# Altium PCB PMP41115.PcbDoc (part 6 of 6)
Units mm, origin at the board's own origin, x right, y up, seen from the top; angles counter-clockwise.
Board outline 102.92 x 46.74 mm, 4 copper layers (Top Layer, Signal Layer 1, Signal Layer 2, Bottom Layer), stack 1.016 mm thick; 174 components, 114 nets, 547 pads, 2622 vias.
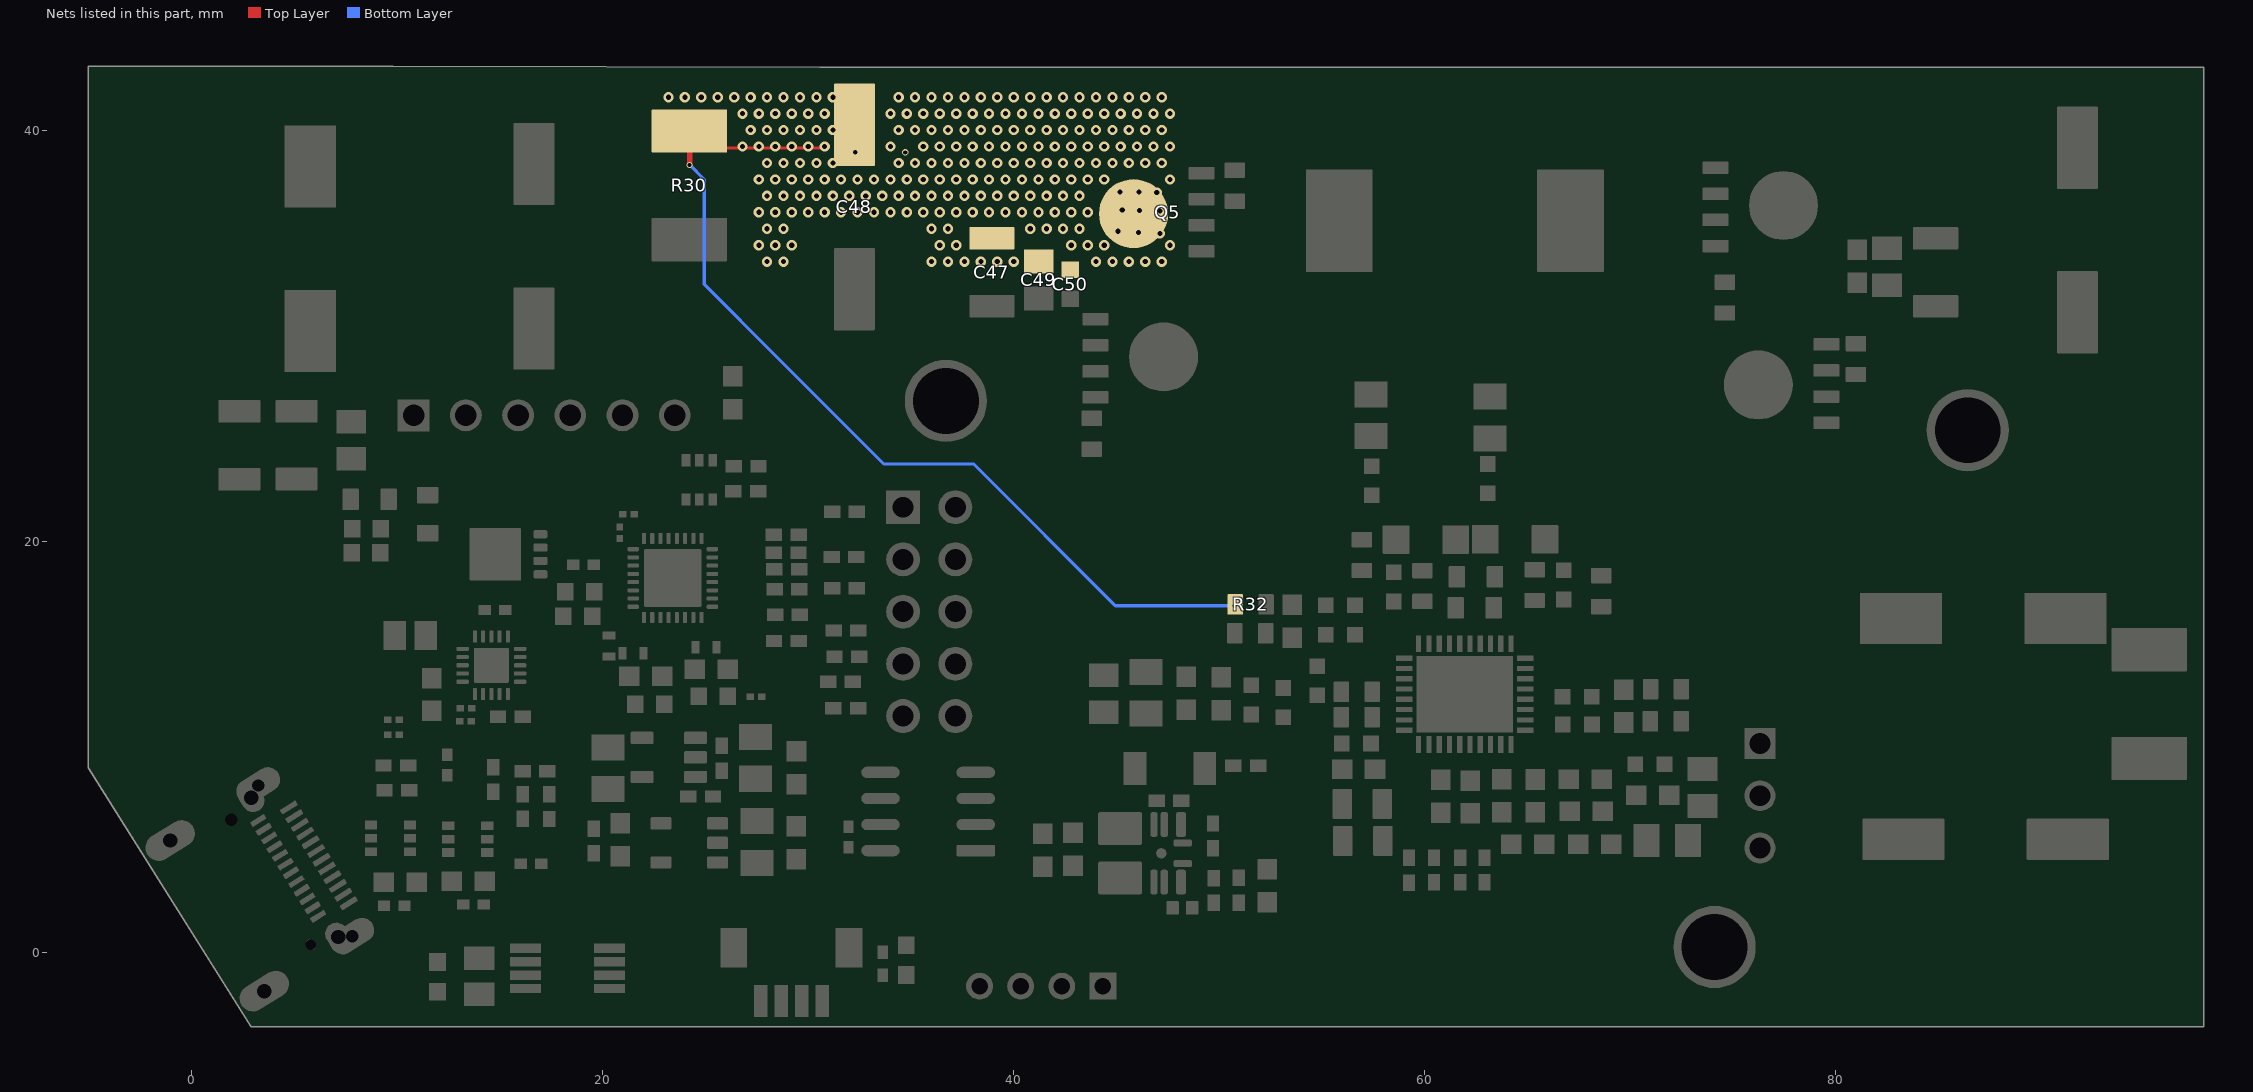
[diagram p6: the nets of this part, all layers, seen from the top]

## Via types
v1: diameter 0.5, hole 0.25, Top Layer to Bottom Layer, 2320 vias
v2: diameter 0.3, hole 0.2, Top Layer to Bottom Layer, tented both sides, 198 vias
v3: diameter 0.5, hole 0.25, Top Layer to Bottom Layer, tented both sides, 61 vias
v4: diameter 0.5, hole 0.2, Top Layer to Bottom Layer, tented both sides, 19 vias
v5: diameter 0.61, hole 0.203, Top Layer to Bottom Layer, tented both sides, 13 vias
v6: diameter 0.5, hole 0.2, Top Layer to Bottom Layer, 6 vias
v7: diameter 0.4, hole 0.2, Top Layer to Bottom Layer, tented both sides, 3 vias
v8: diameter 0.35, hole 0.2, Top Layer to Bottom Layer, tented both sides, 2 vias

## Nets (pads, with @x,y where several pads share a name; then routed paths per layer and width w, separated by ;. In a path a pad name is that pad's centre, name@x,y a point inside that pad or via, vN(x,y) a via of type N, cw(c..) or ccw(c..) an arc to the next point about the centre after c; other vN are vias at no path point) (continued)
VSYS: C47.2 C48.2 C49.1 C50.1 Q5.5-6-7-8 R30.2 R32.2 | length 47
  Top Layer w0.152: R30.2@24.243,39.979 R30.2@24.332,39.89 ; R30.2@24.257,39.091 24.257,39.815 R30.2@24.332,39.89 ; v1@30.863,39.181 30.823,39.141 25.081,39.141 R30.2@24.332,39.89
  Top Layer w0.254: v2(24.257,38.329) 24.257,39.051 24.297,39.091 R30.2@24.308,39.091
  Bottom Layer w0.152: 28.55,28.931 33.706,23.774 38.075,23.774 44.966,16.883 v2(50.764,16.883)
  Bottom Layer w0.154: v2(24.257,38.329) 24.968,37.617 24.968,32.512 28.55,28.931
  other v1: 28.023,33.621 28.823,33.621 36.023,33.621 36.823,33.621 37.623,33.621 38.423,33.621 39.223,33.621 40.023,33.621 44.023,33.621 44.823,33.621 45.623,33.621 46.423,33.621 47.223,33.621 27.623,34.421 28.423,34.421 29.223,34.421 36.423,34.421 37.223,34.421 42.823,34.421 43.623,34.421 44.423,34.421 47.623,34.421 28.023,35.221 28.823,35.221 36.023,35.221 36.823,35.221 40.823,35.221 41.623,35.221 42.423,35.221 43.223,35.221 27.623,36.021 28.423,36.021 29.223,36.021 30.023,36.021 30.823,36.021 31.623,36.021 32.423,36.021 33.223,36.021 34.023,36.021 34.823,36.021 35.623,36.021 36.423,36.021 37.223,36.021 38.023,36.021 38.823,36.021 39.623,36.021 40.423,36.021 41.223,36.021 42.023,36.021 42.823,36.021 43.623,36.021 28.023,36.821 28.823,36.821 29.623,36.821 30.423,36.821 31.223,36.821 32.023,36.821 32.823,36.821 33.623,36.821 34.423,36.821 35.223,36.821 36.023,36.821 36.823,36.821 37.623,36.821 38.423,36.821 39.223,36.821 40.023,36.821 40.823,36.821 41.623,36.821 42.423,36.821 43.223,36.821 27.623,37.621 28.423,37.621 29.223,37.621 30.023,37.621 30.823,37.621 31.623,37.621 32.423,37.621 33.223,37.621 34.023,37.621 34.823,37.621 35.623,37.621 36.423,37.621 37.223,37.621 38.023,37.621 38.823,37.621 39.623,37.621 40.423,37.621 41.223,37.621 42.023,37.621 42.823,37.621 43.623,37.621 44.423,37.621 47.623,37.621 28.023,38.421 28.823,38.421 29.623,38.421 30.423,38.421 31.223,38.421 34.423,38.421 35.223,38.421 36.023,38.421 36.823,38.421 37.623,38.421 38.423,38.421 39.223,38.421 40.023,38.421 40.823,38.421 41.623,38.421 42.423,38.421 43.223,38.421 44.023,38.421 44.823,38.421 45.623,38.421 46.423,38.421 47.223,38.421 26.823,39.221 27.623,39.221 28.423,39.221 29.223,39.221 30.023,39.221 30.823,39.221 34.023,39.221 35.623,39.221 36.423,39.221 37.223,39.221 38.023,39.221 38.823,39.221 39.623,39.221 40.423,39.221 41.223,39.221 42.023,39.221 42.823,39.221 43.623,39.221 44.423,39.221 45.223,39.221 46.023,39.221 46.823,39.221 47.623,39.221 27.223,40.021 28.023,40.021 28.823,40.021 29.623,40.021 30.423,40.021 31.223,40.021 34.423,40.021 35.223,40.021 36.023,40.021 36.823,40.021 37.623,40.021 38.423,40.021 39.223,40.021 40.023,40.021 40.823,40.021 41.623,40.021 42.423,40.021 43.223,40.021 44.023,40.021 44.823,40.021 45.623,40.021 46.423,40.021 47.223,40.021 26.823,40.821 27.623,40.821 28.423,40.821 29.223,40.821 30.023,40.821 30.823,40.821 34.023,40.821 34.823,40.821 35.623,40.821 36.423,40.821 37.223,40.821 38.023,40.821 38.823,40.821 39.623,40.821 40.423,40.821 41.223,40.821 42.023,40.821 42.823,40.821 43.623,40.821 44.423,40.821 45.223,40.821 46.023,40.821 46.823,40.821 47.623,40.821 23.223,41.621 24.023,41.621 24.823,41.621 25.623,41.621 26.423,41.621 27.223,41.621 28.023,41.621 28.823,41.621 29.623,41.621 30.423,41.621 31.223,41.621 34.423,41.621 35.223,41.621 36.023,41.621 36.823,41.621 37.623,41.621 38.423,41.621 39.223,41.621 40.023,41.621 40.823,41.621 41.623,41.621 42.423,41.621 43.223,41.621 44.023,41.621 44.823,41.621 45.623,41.621 46.423,41.621 47.223,41.621
  other v2: 34.747,38.938
  other v3: 47.13,34.995 46.088,35.046 45.098,35.096 47.13,36.087 46.139,36.112 45.301,36.138 46.977,36.976 45.199,37.001 46.114,37.001
  other v5: 32.309,38.938
pads on no net: J1.A2 J1.A3 J1.A10 J1.A11 J1.ALIGN1 J1.ALIGN2 J1.B2 J1.B3 J1.B10 J1.B11 J3.4 J5.5 J5.6 J6.4 Q1.9A Q1.9B Q1.9C Q1.9D U1.21 U2.9 U4.4 U5.1 U5.7 U6.4 U7.15 U7.16 U7.31 U8.2 U8.3

## Polygon pours and split planes (outlines as drawn)
GND on Top Layer "TOP_LAYER_GND_P036" (solid, remove dead copper, pour order 36): -5.004,-3.15 8.331,-3.15 8.331,43.078 -5.004,43.078
GND on Top Layer "TOP_LAYER_GND_P095" (solid, remove dead copper, pour order 95): 10.922,11.633 8.23,11.633 8.23,-3.327 17.958,-3.327 17.958,15.646 10.947,15.646 10.922,15.621
VBUS_C on Top Layer "TOP_LAYER_VBUS_C_P038" (solid, remove dead copper, pour order 38): 8.534,22.606 8.534,15.69 6.579,15.705 6.577,13.588 6.579,11.76 10.617,11.76 10.617,22.606
BAT on Top Layer "TOP_LAYER_BAT_P030" (solid, remove dead copper, pour order 30): 88.392,10.338 88.392,-2.87 97.434,-2.87 97.434,10.338
GND on Top Layer "TOP_LAYER_GND_P028" (solid, remove dead copper, pour order 28): 78.003,-3.023 87.478,-3.023 87.478,22.149 78.003,22.149
GND on Top Layer "TOP_LAYER_GND_P075" (solid, remove dead copper, pour order 75): 39.821,-3.175 79.099,-3.175 79.099,6.564 77.552,6.598 77.521,18.948 39.821,18.948
GND on Top Layer "TOP_LAYER_GND_P044" (solid, remove dead copper, pour order 44): 17.882,-3.378 41.681,-3.378 41.681,5.436 39.319,5.436 39.319,18.796 17.882,18.796
VSYS on Top Layer "TOP_LAYER_VSYS_P022" (solid, remove dead copper, pour order 22): 22.198,42.596 22.201,38.684 27.092,38.684 27.044,32.722 29.769,32.722 29.769,35.238 35.364,35.238 35.35,32.723 47.955,32.766 47.955,42.596
NetU5_5 on Top Layer "TOP_LAYER_NETU5_5_P001" (solid, pour order 1): 46.025,2.896 46.05,2.87 47.015,2.87 47.015,3.962 46.965,4.013 46.025,4.013
NetC21_1 on Top Layer "TOP_LAYER_NETC21_1_P115" (solid, remove dead copper, pour order 115): 46.482,7.696 46.482,5.791 46.66,5.613 47.422,5.613 47.523,5.715 47.523,6.807 47.371,6.96 47.371,7.696 46.507,7.696
PPHV on Top Layer "TOP_LAYER_PPHV_P033" (solid, remove dead copper, pour order 33): 0.483,33.223 0.483,24.841 12.065,24.841 12.065,27.127 3.937,27.127 3.937,33.223
VBUS on Top Layer "TOP_LAYER_VBUS_P034" (solid, remove dead copper, pour order 34): 22.174,25.73 18.771,22.327 13.335,22.327 13.335,21.234 10.82,21.234 10.82,16.205 10.82,14.63 13.894,14.63 13.894,17.729 16.408,17.729 16.408,20.142 16.408,20.752 27.457,20.752 27.457,27.127 22.174,27.127
PP5V on Top Layer "TOP_LAYER_PP5V_P114" (solid, remove dead copper, pour order 114): 20.396,18.136 20.828,18.567 21.768,18.567 21.844,18.491 21.844,17.983 21.768,17.907 20.904,17.907 20.371,17.374 20.371,15.85 19.101,15.85 19.101,17.983 19.253,18.136
VBUS_LV on Top Layer "TOP_LAYER_VBUS_LV_P054" (solid, remove dead copper, pour order 54): 16.586,17.653 13.919,17.653 13.919,15.646 14.808,15.646 14.808,17.043 17.625,17.043 17.805,17.223 17.805,19.228 18.999,19.228 18.999,18.491 21.692,18.491 21.895,18.694 21.895,19.228 21.742,19.38 21.133,19.38 20.396,20.117 16.586,20.117
GND on Top Layer "TOP_LAYER_GND_P039" (solid, remove dead copper, pour order 39): 12.497,27.813 12.497,24.536 0.686,24.536 0.686,21.641 13.03,21.641 13.03,22.657 19.101,22.657 21.92,25.476 21.92,27.813
GND on Top Layer "TOP_LAYER_GND_P032" (solid, remove dead copper, pour order 32): 4.115,27.381 28.118,27.408 28.118,21.107 30.378,21.107 30.378,32.41 4.115,32.41
PPHV on Top Layer "TOP_LAYER_PPHV_P031" (solid, remove dead copper, pour order 31): 0.559,42.647 21.514,42.647 21.514,35.763 26.467,35.763 26.467,32.766 20.498,32.766 0.559,32.766
P_OUT on Top Layer "TOP_LAYER_P_OUT_P029" (solid, remove dead copper, pour order 29): 93.143,33.604 93.089,18.596 88.179,18.596 88.179,13.882 97.739,13.882 97.739,33.604
P_OUT on Top Layer "TOP_LAYER_P_OUT_P027" (solid, remove dead copper, pour order 27): 75.311,42.647 75.311,33.426 97.917,33.426 97.917,42.647
GND on Top Layer "TOP_LAYER_GND_P026" (solid, remove dead copper, pour order 26): 78.537,19.177 85.7,19.177 93.269,19.177 93.269,33.249 78.537,33.249
SW2 on Top Layer "TOP_LAYER_SW2_P025" (solid, remove dead copper, pour order 25): 60.858,23.52 78.207,23.52 78.207,32.461 74.969,32.461 75.006,42.672 60.858,42.672
SW1 on Top Layer "TOP_LAYER_SW1_P024" (solid, remove dead copper, pour order 24): 48.235,42.596 48.235,32.741 48.006,32.512 45.187,32.512 45.187,23.647 59.893,23.647 59.893,42.596
GND on Top Layer "TOP_LAYER_GND_P023" (solid, remove dead copper, pour order 23): 29.186,34.773 29.186,19.101 83.439,19.101 83.439,23.216 45.009,23.216 45.009,34.773
GND on Bottom Layer "BOTTOM_LAYER_GND_P045" (solid, remove dead copper, pour order 45): 0.559,32.309 0.559,0.533 38.989,0.533 38.989,32.309
BAT on Bottom Layer "BOTTOM_LAYER_BAT_P146" (solid, remove dead copper, pour order 146): 88.392,10.338 88.392,-2.946 97.434,-2.946 97.434,10.338
GND on Bottom Layer "BOTTOM_LAYER_GND_P144" (solid, remove dead copper, pour order 144): 78.003,-2.921 87.478,-2.921 87.478,22.149 78.003,22.149
GND on Bottom Layer "BOTTOM_LAYER_GND_P046" (solid, remove dead copper, pour order 46): 35.179,0 77.902,0 77.902,10.312 35.179,10.312
GND on Bottom Layer "BOTTOM_LAYER_GND_P050" (solid, remove dead copper, pour order 50): 39.745,10.361 52.934,10.365 52.934,2.972 77.902,2.972 77.902,19.025 39.745,19.025
P_OUT on Bottom Layer "BOTTOM_LAYER_P_OUT_P145" (solid, remove dead copper, pour order 145): 93.143,33.604 93.089,18.596 88.179,18.596 88.179,13.882 97.739,13.882 97.739,33.604
P_OUT on Bottom Layer "BOTTOM_LAYER_P_OUT_P143" (solid, remove dead copper, pour order 143): 75.311,42.647 75.311,33.426 97.917,33.426 97.917,42.647
GND on Bottom Layer "BOTTOM_LAYER_GND_P142" (solid, remove dead copper, pour order 142): 78.537,19.177 85.7,19.177 93.269,19.177 93.269,33.249 78.537,33.249
SW2 on Bottom Layer "BOTTOM_LAYER_SW2_P141" (solid, remove dead copper, pour order 141): 60.858,23.52 78.207,23.52 78.207,32.461 74.969,32.461 75.006,42.672 60.858,42.672
VBUS on Bottom Layer "BOTTOM_LAYER_VBUS_P005" (solid, remove dead copper, pour order 5): 22.276,25.654 18.872,22.25 13.437,22.25 13.437,21.158 10.922,21.158 10.922,16.129 10.922,14.554 13.995,14.554 13.995,17.653 16.51,17.653 16.51,20.066 16.51,20.676 27.559,20.676 27.559,27.051 22.276,27.051
PPHV on Bottom Layer "BOTTOM_LAYER_PPHV_P007" (solid, remove dead copper, pour order 7): 0.662,32.944 0.662,24.867 12.065,24.867 12.065,27.153 3.937,27.153 3.937,32.944
VSYS on Bottom Layer "BOTTOM_LAYER_VSYS_P004" (solid, remove dead copper, pour order 4): 22.198,42.57 22.201,38.659 27.126,38.659 27.078,32.696 29.769,32.696 29.769,35.212 35.364,35.212 35.35,32.698 47.955,32.741 47.955,42.57
GND on Bottom Layer "BOTTOM_LAYER_GND_P120" (solid, remove dead copper, pour order 120): 35.159,32.398 35.159,35.031 29.931,35.031 29.931,32.371 27.813,32.36 27.813,19.329 80.899,19.329 80.899,23.089 44.602,23.089 44.602,32.36
PPHV on Bottom Layer "BOTTOM_LAYER_PPHV_P051" (solid, remove dead copper, pour order 51): 0.555,42.567 21.51,42.567 21.51,34.922 23.19,34.922 23.19,32.686 20.494,32.686 0.555,32.686
SW1 on Bottom Layer "BOTTOM_LAYER_SW1_P047" (solid, remove dead copper, pour order 47): 48.158,42.596 48.158,32.69 47.93,32.461 45.11,32.461 45.11,23.597 59.766,23.597 59.766,42.596
GND on Signal Layer 1 "SIGNAL_LAYER_1_GND_P069" (solid, remove dead copper, pour order 69): 0.66,4.623 0.66,-2.794 8.407,-2.794 8.407,4.623 8.407,24.308 0.66,24.308
VBUS_C on Signal Layer 1 "SIGNAL_LAYER_1_VBUS_C_P056" (solid, remove dead copper, pour order 56): 8.585,21.565 8.585,15.69 6.629,15.705 6.628,13.588 6.63,11.76 10.668,11.76 10.668,21.565
GND on Signal Layer 1 "SIGNAL_LAYER_1_GND_P073" (solid, remove dead copper, pour order 73): 10.973,11.633 8.28,11.633 8.28,-2.946 18.009,-2.946 18.009,15.646 10.998,15.646 10.973,15.621
BAT on Signal Layer 1 "SIGNAL_LAYER_1_BAT_P134" (solid, remove dead copper, pour order 134): 88.392,10.338 88.392,-2.946 97.434,-2.946 97.434,10.338
GND on Signal Layer 1 "SIGNAL_LAYER_1_GND_P132" (solid, remove dead copper, pour order 132): 78.003,-2.946 87.478,-2.946 87.478,22.149 78.003,22.149
GND on Signal Layer 1 "SIGNAL_LAYER_1_GND_P071" (solid, remove dead copper, pour order 71): 16.205,-2.972 78.029,-2.972 78.029,5.436 41.732,5.436 39.37,5.436 39.37,19.888 16.205,19.888
P_OUT on Signal Layer 1 "SIGNAL_LAYER_1_P_OUT_P133" (solid, remove dead copper, pour order 133): 93.143,33.604 93.089,18.596 88.179,18.596 88.179,13.882 97.739,13.882 97.739,33.604
P_OUT on Signal Layer 1 "SIGNAL_LAYER_1_P_OUT_P131" (solid, remove dead copper, pour order 131): 75.311,42.647 75.311,33.426 97.917,33.426 97.917,42.647
GND on Signal Layer 1 "SIGNAL_LAYER_1_GND_P130" (solid, remove dead copper, pour order 130): 78.537,19.177 85.7,19.177 92.837,19.177 92.837,33.249 78.537,33.249
SW2 on Signal Layer 1 "SIGNAL_LAYER_1_SW2_P129" (solid, remove dead copper, pour order 129): 60.858,23.52 78.207,23.52 78.207,32.487 74.969,32.487 75.006,42.672 60.858,42.672
GND on Signal Layer 1 "SIGNAL_LAYER_1_GND_P057" (solid, remove dead copper, pour order 57): 28.702,35.433 28.702,19.253 81.356,19.253 81.356,23.216 45.06,23.216 45.06,35.433
VSYS on Signal Layer 1 "SIGNAL_LAYER_1_VSYS_P118" (solid, remove dead copper, pour order 118): 22.198,42.57 22.201,38.659 27.092,38.659 27.044,32.696 29.769,32.696 29.769,35.212 35.364,35.212 35.35,32.698 47.955,32.741 47.955,42.57
VBUS on Signal Layer 1 "SIGNAL_LAYER_1_VBUS_P112" (solid, remove dead copper, pour order 112): 22.123,25.679 18.72,22.276 13.284,22.276 13.284,21.184 10.77,21.184 10.77,16.154 10.77,15.875 13.843,15.875 13.843,17.678 16.358,17.678 16.358,20.091 16.358,20.701 26.924,20.701 26.924,27.076 22.123,27.076
PPHV on Signal Layer 1 "SIGNAL_LAYER_1_PPHV_P111" (solid, remove dead copper, pour order 111): 0.611,32.868 0.611,24.79 12.014,24.79 12.014,27.076 3.886,27.076 3.886,32.868
GND on Signal Layer 1 "SIGNAL_LAYER_1_GND_P072" (solid, remove dead copper, pour order 72): 39.623,4.623 78.054,4.623 78.054,18.948 39.623,18.948
GND on Signal Layer 1 "SIGNAL_LAYER_1_GND_P070" (solid, remove dead copper, pour order 70): 12.548,27.813 12.548,24.536 0.737,24.536 0.737,21.641 12.878,21.641 12.878,22.428 18.923,22.428 21.971,25.476 21.971,27.813
GND on Signal Layer 1 "SIGNAL_LAYER_1_GND_P066" (solid, remove dead copper, pour order 66): 4.166,27.381 28.169,27.408 28.169,21.107 30.429,21.107 30.429,32.41 4.166,32.41
PPHV on Signal Layer 1 "SIGNAL_LAYER_1_PPHV_P065" (solid, remove dead copper, pour order 65): 0.61,42.647 21.565,42.647 21.565,35.763 26.518,35.763 26.518,32.766 20.549,32.766 0.61,32.766
SW1 on Signal Layer 1 "SIGNAL_LAYER_1_SW1_P058" (solid, remove dead copper, pour order 58): 48.285,42.647 48.285,32.741 48.057,32.512 45.237,32.512 45.237,23.647 59.893,23.647 59.893,42.647
GND on Signal Layer 2 "SIGNAL_LAYER_2_GND_P089" (solid, remove dead copper, pour order 89): 0.686,4.597 0.686,-2.769 8.433,-2.769 8.433,4.597 8.433,24.282 0.686,24.282
GND on Signal Layer 2 "SIGNAL_LAYER_2_GND_P094" (solid, remove dead copper, pour order 94): 10.998,15.596 8.306,15.596 8.306,-2.718 18.034,-2.718 18.034,15.621 11.024,15.621
GND on Signal Layer 2 "SIGNAL_LAYER_2_GND_P092" (solid, remove dead copper, pour order 92): 16.332,-2.692 78.003,-2.692 78.003,5.41 41.758,5.41 39.395,5.41 39.395,19.71 16.332,19.71
BAT on Signal Layer 2 "SIGNAL_LAYER_2_BAT_P140" (solid, remove dead copper, pour order 140): 88.392,10.338 88.392,-2.616 97.434,-2.616 97.434,10.338
GND on Signal Layer 2 "SIGNAL_LAYER_2_GND_P138" (solid, remove dead copper, pour order 138): 78.003,-2.616 87.478,-2.616 87.478,22.149 78.003,22.149
P_OUT on Signal Layer 2 "SIGNAL_LAYER_2_P_OUT_P139" (solid, remove dead copper, pour order 139): 93.143,33.604 93.089,18.596 88.179,18.596 88.179,13.882 97.739,13.882 97.739,33.604
P_OUT on Signal Layer 2 "SIGNAL_LAYER_2_P_OUT_P137" (solid, remove dead copper, pour order 137): 75.311,42.647 75.311,33.426 97.917,33.426 97.917,42.647
GND on Signal Layer 2 "SIGNAL_LAYER_2_GND_P136" (solid, remove dead copper, pour order 136): 78.537,19.177 85.7,19.177 93.269,19.177 93.269,33.249 78.537,33.249
SW2 on Signal Layer 2 "SIGNAL_LAYER_2_SW2_P135" (solid, remove dead copper, pour order 135): 60.858,23.52 78.207,23.52 78.207,32.461 74.969,32.461 75.006,42.672 60.858,42.672
VSYS on Signal Layer 2 "SIGNAL_LAYER_2_VSYS_P119" (solid, remove dead copper, pour order 119): 22.198,42.57 22.201,38.659 27.092,38.659 27.044,32.696 29.769,32.696 29.769,35.212 35.364,35.212 35.35,32.698 47.955,32.741 47.955,42.57
GND on Signal Layer 2 "SIGNAL_LAYER_2_GND_P093" (solid, remove dead copper, pour order 93): 39.929,4.597 78.08,4.597 78.08,18.923 39.929,18.923
GND on Signal Layer 2 "SIGNAL_LAYER_2_GND_P091" (solid, remove dead copper, pour order 91): 12.573,27.788 12.573,24.511 0.66,24.511 0.66,21.615 12.319,21.615 12.319,23.622 20.168,23.622 21.996,25.451 21.996,27.788
VBUS_C on Signal Layer 2 "SIGNAL_LAYER_2_VBUS_C_P090" (solid, remove dead copper, pour order 90): 8.611,22.581 8.611,15.665 8.611,15.342 10.693,15.342 10.693,22.581
VBUS on Signal Layer 2 "SIGNAL_LAYER_2_VBUS_P088" (solid, remove dead copper, pour order 88): 22.25,25.705 19.964,23.419 12.675,23.419 12.675,21.209 10.897,21.209 10.897,16.18 10.897,14.605 13.97,14.605 13.97,17.704 16.485,17.704 16.485,20.117 16.485,20.726 27.051,20.726 27.051,27.102 22.25,27.102
PPHV on Signal Layer 2 "SIGNAL_LAYER_2_PPHV_P087" (solid, remove dead copper, pour order 87): 0.279,32.893 0.279,24.816 12.141,24.816 12.141,27.102 4.013,27.102 4.013,32.893
GND on Signal Layer 2 "SIGNAL_LAYER_2_GND_P086" (solid, remove dead copper, pour order 86): 4.191,27.356 28.194,27.383 28.194,21.082 30.455,21.082 30.455,32.385 4.191,32.385
PPHV on Signal Layer 2 "SIGNAL_LAYER_2_PPHV_P085" (solid, remove dead copper, pour order 85): 0.635,42.621 21.59,42.621 21.59,35.738 26.543,35.738 26.543,32.741 20.574,32.741 0.635,32.741
SW1 on Signal Layer 2 "SIGNAL_LAYER_2_SW1_P078" (solid, remove dead copper, pour order 78): 48.311,42.621 48.311,32.715 48.082,32.487 45.263,32.487 45.263,23.622 59.919,23.622 59.919,42.621
GND on Signal Layer 2 "SIGNAL_LAYER_2_GND_P077" (solid, remove dead copper, pour order 77): 28.219,35.941 28.219,19.431 80.289,19.431 80.289,23.19 45.085,23.19 45.085,35.941

## Keep-outs
Keep-Out Layer:
  text ".Layer_Name" at 14.656,-21.222 h1.52

## Other copper
Top Layer:
  text ".Layer_Name" at 14.656,-21.222 h1.52
Bottom Layer:
  text ".Layer_Name" at 14.656,-21.222 h1.52

## Silkscreen, mask and mechanical layers (free items; w line width, h text height)
Top Overlay:
  text "High Temp !" at 45.618,24.098 h2
  text "High Temp !" at 67.437,23.92 h2
  text "I2Ct to esp 32" at 46.457,-1.6 h1.52
  text ".Layer_Name" at 14.656,-21.222 h1.52
Bottom Overlay:
  text ".Layer_Name" at 14.656,-21.222 h1.52
Top Paste:
  text ".Layer_Name" at 14.656,-21.222 h1.52
Bottom Paste:
  text ".Layer_Name" at 14.656,-21.222 h1.52
Top Solder:
  rectangle: 78.689,-2.819 86.97,20.93
  rectangle: 88.951,-2.54 97.079,8.661
  rectangle: 1.27,34.366 20.726,41.859
  rectangle: 88.621,14.351 96.952,18.059
  rectangle: 93.904,15.773 97.079,34.646
  rectangle: 76.073,34.011 97.13,42.113
  rectangle: 48.717,31.623 52.095,35.433
  rectangle: 35.712,33.223 47.727,36.22
  rectangle: 29.134,36.017 47.752,42.316
  rectangle: 64.973,24.028 78.029,30.226
  rectangle: 45.593,24.054 55.753,31.826
  rectangle: 61.214,26.34 72.923,42.113
  rectangle: 51.816,26.441 59.36,42.189
  text ".Layer_Name" at 14.656,-21.222 h1.52
  text ".Layer_Name" at 14.656,-21.222 h1.52
Bottom Solder:
  rectangle: 88.632,14.275 96.749,18.159
  rectangle: 1.092,25.349 3.404,33.985
  rectangle: 5.08,28.067 23.495,31.826
  rectangle: 59.385,10.566 64.745,14.656
  rectangle: 45.644,19.71 82.169,22.581
  rectangle: 1.041,33.706 20.574,41.834
  rectangle: 79.019,14.249 86.716,22.631
  rectangle: 94.132,18.059 96.723,34.671
  rectangle: 82.144,19.609 92.227,32.537
  region: 33.844,24.464 42.45,24.48 42.437,31.481 33.831,31.465
  rectangle: 27.711,35.712 47.777,41.885
  rectangle: 75.794,34.493 96.723,42.088
  rectangle: 45.872,23.978 49.682,31.826
  rectangle: 48.514,37.871 53.137,41.91
  rectangle: 66.37,32.817 74.651,42.037
  rectangle: 66.853,24.028 77.622,29.997
  rectangle: 61.392,24.079 70.841,42.037
  rectangle: 52.553,33.858 58.953,41.885
  rectangle: 48.768,24.003 58.928,35.204
  rectangle: 88.697,-2.769 96.825,8.526
  rectangle: 79.121,-2.997 87.249,8.509
  text ".Layer_Name" at 14.656,-21.222 h1.52
Drill Guide:
  text ".Layer_Name" at 14.656,-21.222 h1.52
M1 Board Outline:
  lines w0.2: -5.004,43.129 9.804,43.129 ; 9.83,43.129 30.582,43.078 ; 30.556,43.078 53.188,43.078 ; 53.238,43.078 97.917,43.078 97.917,-3.607
  lines w0.254: -5.004,8.966 -5.004,43.129 ; -5.004,9 2.925,-3.607 70.739,-3.607 71.133,-3.607 75.87,-3.607 97.917,-3.607
  text ".Layer_Name" at 14.656,-21.222 h1.52
M2 Board Dimensions:
  rectangle: 0,-6.401 3.175,-3.226
  rectangle: 3.175,-9.576 12.7,-6.401
  lines w0.178: 0,-6.401 25.4,-6.401 ; 3.175,-9.576 3.175,-3.226 ; 6.35,-9.576 6.35,-3.226 ; 12.7,-9.576 12.7,-3.226 ; 19.05,-9.576 19.05,-3.226 ; 0,-9.576 25.4,-9.576 25.4,-3.226 0,-3.226 0,-9.576
  text ".Layer_Name" at 14.656,-21.222 h1.52
M3 3D STEP Top:
  text ".Layer_Name" at 14.656,-21.222 h1.52
M4 3D STEP Bottom:
  text ".Layer_Name" at 14.656,-21.222 h1.52
M5 Assembly Top:
  lines w0.254: -7.417,-23.042 160.223,-23.042 ; -7.417,-17.877 160.274,-17.877 ; -7.417,-12.713 -7.417,-28.207 94.31,-28.207 160.274,-28.207 160.274,-12.713 -7.404,-12.713 -7.404,-28.207 32.614,-28.207 ; 55.194,-28.207 55.194,-12.713 ; 87.376,-17.877 87.376,-12.713 ; 108.712,-17.877 108.712,-12.713 ; 124.511,-28.372 124.511,-23.22
  text "COMPONENTS MARKED 'DNP' SHOULD NOT BE POPULATED." at 14.834,46.507 h1.52
  text "ASSEMBLY VARIANT:" at 29.286,-10.439 h1.52
  text ".VariantName" at 55.601,-10.439 h1.52
  text "PCB VIEWED FROM TOP SIDE" at -5.804,-16.07 h1.52
  text "BOARD #:" at 57.099,-16.07 h1.52
  text ".PRJ_Number" at 70.955,-16.07 h1.52
  text "REV:" at 92.405,-16.07 h1.52
  text ".PCB_Rev" at 99.809,-16.07 h1.52
  text "SVN REV:" at 113.69,-16.07 h1.52
  text ".VersionControl_RevNumber" at 126.543,-16.07 h1.52
  text "TID #:" at 57.099,-21.234 h1.52
  text ".TID" at 70.955,-21.234 h1.52
  text "PLOT NAME =" at -5.804,-26.45 h1.52
  text ".plot_File_Name" at 14.656,-26.45 h1.52
  text "GENERATED    :" at 57.15,-26.45 h1.52
  text ".Print_Date" at 79.235,-26.45 h1.52
  text ".Print_Time" at 97.752,-26.45 h1.52
  text "TEXAS INSTRUMENTS" at 129.87,-26.45 h1.52
M6 Assembly Bottom:
  lines w0.254: -7.429,-17.89 160.261,-17.89 ; -7.379,-23.055 160.261,-23.055 ; 28.334,-28.384 28.334,-23.233 ; 44.133,-17.89 44.133,-12.725 ; 65.468,-17.89 65.468,-12.725 ; 97.65,-28.219 97.65,-12.725 ; 120.231,-28.219 160.249,-28.219 160.249,-12.725 -7.429,-12.725 -7.429,-28.219 58.534,-28.219 160.261,-28.219 160.261,-12.725
  text ".VariantName" at 128.473,-10.439 h1.52
  text "ASSEMBLY VARIANT:" at 154.864,-10.439 h1.52
  text "COMPONENTS MARKED 'DNP' SHOULD NOT BE POPULATED." at 125.222,-12.37 h1.52
  text ".VersionControl_RevNumber" at 26.302,-16.082 h1.52
  text "SVN REV:" at 39.154,-16.082 h1.52
  text ".PCB_Rev" at 53.035,-16.082 h1.52
  text "REV:" at 60.439,-16.082 h1.52
  text ".PRJ_Number" at 81.89,-16.082 h1.52
  text "BOARD #:" at 95.745,-16.082 h1.52
  text "PCB VIEWED FROM BOTTOM SIDE" at 158.648,-16.082 h1.52
  text ".TID" at 81.89,-21.247 h1.52
  text "TID #:" at 95.745,-21.247 h1.52
  text "TEXAS INSTRUMENTS" at 22.974,-26.463 h1.52
  text ".Print_Time" at 55.093,-26.463 h1.52
  text ".Print_Date" at 73.609,-26.463 h1.52
  text "GENERATED    :" at 95.694,-26.463 h1.52
  text ".plot_File_Name" at 138.189,-26.463 h1.52
  text "PLOT NAME =" at 158.648,-26.463 h1.52
M9 Title Sheet:
  drawing of 57 lines, arcs and shapes, not listed
  text "1" at 18.792,204.711 h1.78
  text "2" at 82.182,204.711 h1.78
  text "3" at 145.411,204.711 h1.78
  text "4" at 209.08,204.711 h1.78
  text "5" at 272.555,204.711 h1.78
  text "6" at 336.182,204.711 h1.78
  text "A" at -10.579,175.679 h1.78
  text "A" at 365.341,175.679 h1.78
  text "B" at -10.579,115.227 h1.78
  text "B" at 365.341,115.227 h1.78
  text "C" at -10.579,54.902 h1.78
  text "C" at 365.341,54.902 h1.78
  text "PROJECT TITLE:" at 288.125,7.633 h1.14
  text ".PRJ_Title" at 289.395,4.246 h1.78
  text "DESIGNED FOR:" at 288.125,-0.013 h1.14
  text ".PRJ_Customer" at 289.395,-3.569 h1.78
  text "D" at -10.579,-5.296 h1.78
  text "D" at 365.341,-5.296 h1.78
  text "FILE NAME:" at 288.125,-7.633 h1.14
  text ".PCB_File_Name_No_Path" at 289.395,-10.681 h1.78
  text "Texas Instruments (TI) and/or its licensors do not warrant the accuracy or completeness of this specification" at 161.9,-14.791 h1.14
  text "ENGINEER:" at 288.125,-14.999 h1.14
  text "LAYOUT BY:" at 326.352,-14.999 h1.14
  text "or any information contained therein. TI and/or its licensors do not warrant that this design will meet" at 160.757,-17.653 h1.14
  text ".PRJ_Engineer" at 289.395,-18.936 h1.78
  text ".PCB_Layout" at 327.635,-18.936 h1.78
  text "the specifications, will be suitable for your application or fit for any particular purpose, or will operate in" at 160.757,-20.515 h1.14
  text ".Layer_Name" at 14.656,-21.222 h1.52
  text "ALTIUM DESIGNER VERSION:" at 326.352,-22.873 h1.14
  text "an implementation. TI and/or its licensors do not warrant that the design is production worthy. You should" at 160.757,-23.376 h1.14
  text "completely validate and test your design implementation to confirm the system functionality for your application." at 161.9,-26.238 h1.14
  text ".print_Scale" at 289.395,-26.259 h1.78
  text ".Application_BuildNumber" at 327.635,-26.259 h1.78
  text "1" at 18.792,-31.509 h1.78
  text "2" at 82.182,-31.509 h1.78
  text "3" at 145.411,-31.509 h1.78
  text "4" at 209.08,-31.509 h1.78
  text "5" at 272.555,-31.509 h1.78
  text "6" at 336.182,-31.509 h1.78
M10 Fab Notes:
  drawing of 189 lines, arcs and shapes, not listed
  text "DESIGN INFORMATION" at 314.503,162.031 h1.52
  text "MIN. TRACK WIDTH:" at 298.131,158.675 h1.52
  text "8" at 325.976,158.675 h1.52
  text "MIL" at 329.907,158.675 h1.52
  text "7.874" at 321.75,155.584 h1.52
  text "MIN. CLEARANCE:" at 298.131,155.522 h1.52
  text "MIL" at 329.907,155.522 h1.52
  text "MIN. VIA PAD SIZE:" at 298.131,152.369 h1.52
  text "24" at 325.214,152.369 h1.52
  text "MIL" at 329.907,152.369 h1.52
  text "0.05mm (2MIL)" at 315.784,149.07 h1.52
  text "MINIMUM ANNULAR RING" at 289.769,148.861 h1.52
  text "EXTERNAL" at 333.768,148.861 h1.52
  text "PER" at 294.849,146.064 h1.52
  text "IPC-D-275 CLASS 2 LEVEL C" at 300.437,146.064 h1.52
  text "MIL, HOLES" at 338.238,143.512 h1.52
  text "+/-" at 328.27,143.294 h1.52
  text "+/-" at 349.961,143.294 h1.52
  text "REGISTRATION TOLERANCES:" at 289.769,143.267 h1.52
  text "METAL" at 320.243,143.267 h1.52
  text "5" at 334.879,143.267 h1.52
  text "3" at 356.037,143.267 h1.52
  text "MIL" at 358.99,143.267 h1.52
  text "HOLE SIZE TOLERANCE (UNLESS OTHERWISE SPECIFIED):" at 289.769,140.769 h1.52
  text "+/-" at 349.961,140.696 h1.52
  text "3" at 356.037,140.67 h1.52
  text "MIL" at 358.99,140.669 h1.52
  text "MATERIAL:" at 287.87,137.173 h1.52
  text "FR-4 High Tg" at 312.926,133.909 h1.52
  text "X" at 309.257,133.706 h1.52
  text "FR-4" at 298.563,133.591 h1.52
  text "OTHER" at 336.358,133.591 h1.52
  text "62 MIL (1.6mm) +/-10%" at 306.694,129.958 h1.52
  text "X" at 303.643,129.896 h1.52
  text "THICKNESS:" at 289.769,129.749 h1.52
  text "OTHER" at 339.33,129.749 h1.52
  text "TOLERANCE:" at 289.769,126.236 h1.52
  text "X" at 311.314,126.236 h1.52
  text "ANSI IPC-6012 TYPE 3 CLASS 2" at 315.836,126.236 h1.52
  text "OTHER +/-" at 315.835,122.574 h1.52
  text "BOW & TWIST:" at 289.769,118.886 h1.52
  text "X" at 311.314,118.886 h1.52
  text "ANSI IPC-6012 TYPE 3 CLASS 2" at 315.836,118.886 h1.52
  text "OTHER +/-" at 315.835,115.16 h1.52
  text "DRILLING:" at 287.87,111.842 h1.52
  text "NC_DRILL FILES" at 332.599,109.17 h1.52
  text "REFERENCE:" at 289.769,109.07 h1.52
  text "X" at 306.463,109.068 h1.52
  text "AS SHOWN" at 310.984,109.07 h1.52
  text "X" at 329.348,109.07 h1.52
  text "OTHER" at 340.168,105.457 h1.52
  text "PTH COPPER THICKNESS:" at 289.761,105.367 h1.52
  text "X" at 318.697,105.367 h1.52
  text "20-30 um" at 321.948,105.367 h1.52
  text "BOARD FINISH:" at 287.87,101.618 h1.52
  text "SILKSCREEN:" at 291.812,98.821 h1.52
  text "X" at 316.14,98.821 h1.52
  text "TOP" at 319.112,98.821 h1.52
  text "X" at 329.094,98.821 h1.52
  text "BOTTOM" at 332.091,98.821 h1.52
  text "SILKSCREEN COLOR:" at 291.812,94.879 h1.52
  text "X" at 316.115,94.879 h1.52
  text "WHITE" at 319.112,94.879 h1.52
  text "OTHER" at 332.091,94.879 h1.52
  text "X" at 319.442,91.236 h1.52
  text "GREEN" at 322.439,91.236 h1.52
  text "OTHER" at 338.136,91.236 h1.52
  text "SOLDER RESIST COLOR:" at 291.812,91.061 h1.52
  text "X" at 319.442,87.318 h1.52
  text "MATTE" at 322.439,87.318 h1.52
  text "SEMI-GLOSS" at 338.125,87.302 h1.52
  text "IMMERSION GOLD (ENIG)" at 314.819,82.929 h1.52
  text "ENEPIG" at 348.793,82.746 h1.52
  text "SURFACE FINISH:" at 287.87,82.721 h1.52
  text "X" at 310.298,82.721 h1.52
  text "IMM. TIN/SILVER OR EQUIV" at 296.24,79.233 h1.52
  text "OTHER" at 332.599,79.133 h1.52
  text "ARRAY/PANEL:" at 287.87,75.186 h1.52
  text "CUT AND TRIM PER M1 BOARD OUTLINE" at 314.819,74.977 h1.52
  text "N.C. ROUTE" at 314.819,71.524 h1.52
  text "X" at 332.295,71.524 h1.52
  text "V. SCORE" at 336.816,71.524 h1.52
  text "CERTIFICATION:" at 287.87,68.244 h1.52
  text "MATERIALS AND WORKMANSHIP FOR ALL PCBS" at 306.285,68.244 h1.52
  text "TO MEET OR EXCEED THE REQUIREMENTS OF:" at 306.285,65.855 h1.52
  text "X" at 297.078,62.588 h1.52
  text "ANSI IPC-A-600F CLASS ->" at 300.329,62.588 h1.52
  text "X" at 342.188,62.588 h1.52
  text "2" at 344.982,62.588 h1.52
  text "1" at 336.981,62.55 h1.52
  text "3" at 353.973,62.55 h1.52
  text "X" at 317.702,58.836 h1.52
  text "RoHS" at 320.953,58.836 h1.52
  text "OTHER" at 337.321,58.836 h1.52
  text "PER ORDER" at 347.407,58.836 h1.52
  text "ALL BOARDS MUST MEET OR EXCEED UL94-V0 REQUIREMENTS." at 288.569,54.929 h1.52
  text "PCB MUST BEAR THE UL94V-0 UL REGISTERED MATERIAL ID NUMBER" at 288.569,51.981 h1.52
  text "ADDITIONAL REQUIREMENTS:" at 287.87,47.678 h1.52
  text "MICROSECTION:" at 289.769,44.957 h1.52
  text "YES" at 312.775,44.957 h1.52
  text "REQUIRED" at 334.657,41.291 h1.52
  text "BARE BOARD ELEC. TEST:" at 289.769,41.218 h1.52
  text "NONE" at 322.935,41.218 h1.52
  text "X" at 331.66,41.218 h1.52
  text "PER ORDER" at 349.693,41.218 h1.52
  text "XX MIL VIAS REQUIRE NON-CONDUCTIVE FILL AND PLANARIZE" at 294.04,36.013 h1.5
  text "XX MIL VIAS REQUIRE CONDUCTIVE FILL AND PLANARIZE" at 294.243,33.372 h1.52
  text "OUTER XX MIL TRACES REQUIRE 50 OHM SINGLE-ENDED IMPEDANCE" at 294.218,29.222 h1.47
  text "LAYER 2 & 3 (INNER LAYERS) XX MIL WIDE, XX MIL SPACE / TRACES REQUIRE 100 OHM DIFFERENTIAL IMPEDANCE" at 294.015,23.235 h1.52
  text ".Layer_Name" at 14.656,-21.222 h1.52
M11 Gerber Information:
  lines w0.254: -7.417,-23.042 160.223,-23.042 ; -7.417,-17.877 160.274,-17.877 ; -7.417,-12.713 -7.417,-28.207 94.31,-28.207 160.274,-28.207 160.274,-12.713 -7.404,-12.713 -7.404,-28.207 32.614,-28.207 ; 55.194,-28.207 55.194,-12.713 ; 87.376,-17.877 87.376,-12.713 ; 108.712,-17.877 108.712,-12.713 ; 124.511,-28.372 124.511,-23.22
  text "ALL ARTWORK VIEWED FROM TOP SIDE" at -5.804,-16.07 h1.52
  text "BOARD #:" at 57.099,-16.07 h1.52
  text ".PRJ_Number" at 70.955,-16.07 h1.52
  text "REV:" at 92.405,-16.07 h1.52
  text ".PCB_Rev" at 99.809,-16.07 h1.52
  text "SVN REV:" at 113.69,-16.07 h1.52
  text ".VersionControl_RevNumber" at 126.543,-16.07 h1.52
  text "LAYER NAME =" at -5.804,-21.222 h1.52
  text "TID #:" at 57.099,-21.234 h1.52
  text ".TID" at 70.955,-21.234 h1.52
  text "PLOT NAME =" at -5.804,-26.45 h1.52
  text ".plot_File_Name" at 14.656,-26.45 h1.52
  text "GENERATED    :" at 57.15,-26.45 h1.52
  text ".Print_Date" at 79.235,-26.45 h1.52
  text ".Print_Time" at 97.752,-26.45 h1.52
  text "TEXAS INSTRUMENTS" at 129.87,-26.45 h1.52
M12 Stackup:
  drawing of 295 lines, arcs and shapes, not listed
  text "Layer" at 249.469,200.608 h1.52
  text "Name" at 259.88,200.608 h1.52
  text "Material" at 283.75,200.608 h1.52
  text "Thickness" at 305.588,200.608 h1.52
  text "Constant" at 322.094,200.608 h1.52
  text "Board Layer Stack" at 336.568,200.608 h1.52
  text "Top Overlay" at 259.88,197.56 h1.52
  text "Top Solder" at 259.88,194.512 h1.52
  text "Solder Resist" at 283.75,194.512 h1.52
  text "0.40mil" at 305.588,194.512 h1.52
  text "3.5" at 322.094,194.512 h1.52
  text "1" at 249.469,191.464 h1.52
  text "Top Layer" at 259.88,191.464 h1.52
  text "1.40mil" at 305.588,191.464 h1.52
  text "Dielectric 1" at 259.88,188.416 h1.52
  text "FR-4 High Tg" at 283.75,188.416 h1.52
  text "5.00mil" at 305.588,188.416 h1.52
  text "4.2" at 322.094,188.416 h1.52
  text "2" at 249.469,185.368 h1.52
  text "Signal Layer 1" at 259.88,185.368 h1.52
  text "1.40mil" at 305.588,185.368 h1.52
  text "Dielectric 2" at 259.88,182.32 h1.52
  text "FR-4 High Tg" at 283.75,182.32 h1.52
  text "24.40mil" at 305.588,182.32 h1.52
  text "4.2" at 322.094,182.32 h1.52
  text "3" at 249.469,179.272 h1.52
  text "Signal Layer 2" at 259.88,179.272 h1.52
  text "1.40mil" at 305.588,179.272 h1.52
  text "Dielectric 3" at 259.88,176.224 h1.52
  text "FR-4 High Tg" at 283.75,176.224 h1.52
  text "5.00mil" at 305.588,176.224 h1.52
  text "4.2" at 322.094,176.224 h1.52
  text "4" at 249.469,173.176 h1.52
  text "Bottom Layer" at 259.88,173.176 h1.52
  text "1.40mil" at 305.588,173.176 h1.52
  text "Bottom Solder" at 259.88,170.128 h1.52
  text "Solder Resist" at 283.75,170.128 h1.52
  text "0.40mil" at 305.588,170.128 h1.52
  text "3.5" at 322.094,170.128 h1.52
  text "Bottom Overlay" at 259.88,167.08 h1.52
  text ".Layer_Name" at 14.656,-21.222 h1.52
M13 Component Bodies Top:
  text ".Layer_Name" at 14.656,-21.222 h1.52
M14 Component Bodies Bottom:
  text ".Layer_Name" at 14.656,-21.222 h1.52
M15 Courtyards Top:
  text ".Layer_Name" at 14.656,-21.222 h1.52
M16 Courtyards Bottom:
  text ".Layer_Name" at 14.656,-21.222 h1.52
Drill Drawing:
  circle w0.254: c101.697,17.983 r0.702
  lines w0.254: 100.995,7.808 102.399,7.808 102.399,9.211 100.995,9.211 100.995,7.808 ; 100.995,10.966 101.697,11.316 102.399,10.966 102.048,11.667 102.399,12.369 101.697,12.018 100.995,12.369 101.346,11.667 100.995,10.966 ; 100.995,14.474 101.346,14.474 101.697,14.123 102.048,14.474 102.399,14.474 102.048,14.825 102.399,15.176 102.048,15.176 101.697,15.527 101.346,15.176 100.995,15.176 101.346,14.825 100.995,14.474 ; 100.995,20.79 101.346,20.79 101.346,20.439 102.048,20.439 102.048,20.79 102.399,20.79 102.399,21.491 102.048,21.491 102.048,21.842 101.346,21.842 101.346,21.491 100.995,21.491 100.995,20.79 ; 100.995,23.597 102.399,23.597 102.399,25 100.995,25 100.995,23.597 ; 100.995,27.105 101.346,27.105 101.346,26.754 102.048,26.754 102.048,27.105 102.399,27.105 102.399,27.807 102.048,27.807 102.048,28.158 101.346,28.158 101.346,27.807 100.995,27.807 100.995,27.105 ; 100.995,29.912 101.697,30.263 102.399,29.912 102.048,30.614 102.399,31.315 101.697,30.965 100.995,31.315 101.346,30.614 100.995,29.912 ; 100.995,34.473 102.399,34.473 101.697,33.07 100.995,34.473 ; 100.995,36.578 101.346,36.578 101.697,36.227 102.048,36.578 102.399,36.578 102.048,36.929 102.399,37.28 102.048,37.28 101.697,37.631 101.346,37.28 100.995,37.28 101.346,36.929 100.995,36.578 ; 100.995,40.087 101.697,39.385 102.399,40.087 101.697,40.789 100.995,40.087 ; 100.995,43.946 102.399,43.946 101.697,42.543 100.995,43.946 ; 101.276,20.93 101.486,20.93 101.486,20.719 101.907,20.719 101.907,20.93 102.118,20.93 102.118,21.351 101.907,21.351 101.907,21.562 101.486,21.562 101.486,21.351 101.276,21.351 101.276,20.93 ; 101.276,23.877 102.118,23.877 102.118,24.719 101.276,24.719 101.276,23.877 ; 101.276,30.193 101.697,30.403 102.118,30.193 101.907,30.614 102.118,31.035 101.697,30.824 101.276,31.035 101.486,30.614 101.276,30.193 ; 101.276,34.192 102.118,34.192 101.697,33.35 101.276,34.192 ; 101.276,36.719 101.486,36.719 101.697,36.508 101.907,36.719 102.118,36.719 101.907,36.929 102.118,37.14 101.907,37.14 101.697,37.35 101.486,37.14 101.276,37.14 101.486,36.929 101.276,36.719
  lines w0.305: 99.723,6.861 181.807,6.861 ; 99.723,44.753 181.807,44.753 ; 108.305,3.703 108.305,47.911 ; 116.742,3.703 116.742,47.911 ; 132.91,3.703 132.91,47.911 ; 139.492,3.703 139.492,47.911 ; 149.021,3.703 149.021,47.911 ; 167.419,3.703 167.419,47.911 ; 99.723,3.703 181.807,3.703 181.807,47.911 99.723,47.911 99.723,3.703
  text "Symbol" at 101.617,45.701 h1.83
  text "Quantity" at 109.252,45.701 h1.83
  text "Finished Hole Size" at 117.689,45.701 h1.83
  text "Plated" at 133.858,45.701 h1.83
  text "Hole Type" at 140.44,45.701 h1.83
  text "Drill Layer Pair" at 149.969,45.701 h1.83
  text "Hole Tolerance" at 168.367,45.701 h1.83
  text "1" at 109.252,42.543 h1.52
  text "23.62mil (0.600mm)" at 117.689,42.543 h1.52
  text "NPTH" at 133.858,42.543 h1.52
  text "Round" at 140.44,42.543 h1.52
  text "Top Layer - Bottom Layer" at 149.969,42.543 h1.52
  text "+/-1.18mil" at 168.367,42.543 h1.52
  text "228" at 109.252,39.385 h1.52
  text "7.87mil (0.200mm)" at 117.689,39.385 h1.52
  text "PTH" at 133.858,39.385 h1.52
  text "Round" at 140.44,39.385 h1.52
  text "Top Layer - Bottom Layer" at 149.969,39.385 h1.52
  text "13" at 109.252,36.227 h1.52
  text "8.00mil (0.203mm)" at 117.689,36.227 h1.52
  text "PTH" at 133.858,36.227 h1.52
  text "Round" at 140.44,36.227 h1.52
  text "Top Layer - Bottom Layer" at 149.969,36.227 h1.52
  text "2381" at 109.252,33.07 h1.52
  text "9.84mil (0.250mm)" at 117.689,33.07 h1.52
  text "PTH" at 133.858,33.07 h1.52
  text "Round" at 140.44,33.07 h1.52
  text "Top Layer - Bottom Layer" at 149.969,33.07 h1.52
  text "4" at 109.252,29.912 h1.52
  text "31.50mil (0.800mm)" at 117.689,29.912 h1.52
  text "PTH" at 133.858,29.912 h1.52
  text "Round" at 140.44,29.912 h1.52
  text "Top Layer - Bottom Layer" at 149.969,29.912 h1.52
  text "13" at 109.252,26.754 h1.52
  text "40.00mil (1.016mm)" at 117.689,26.754 h1.52
  text "PTH" at 133.858,26.754 h1.52
  text "Round" at 140.44,26.754 h1.52
  text "Top Layer - Bottom Layer" at 149.969,26.754 h1.52
  text "6" at 109.252,23.597 h1.52
  text "40.95mil (1.040mm)" at 117.689,23.597 h1.52
  text "PTH" at 133.858,23.597 h1.52
  text "Round" at 140.44,23.597 h1.52
  text "Top Layer - Bottom Layer" at 149.969,23.597 h1.52
  text "3" at 109.252,20.439 h1.52
  text "125.98mil (3.200mm)" at 117.689,20.439 h1.52
  text "PTH" at 133.858,20.439 h1.52
  text "Round" at 140.44,20.439 h1.52
  text "Top Layer - Bottom Layer" at 149.969,20.439 h1.52
  text "1" at 109.252,17.281 h1.52
  text "19.69mil (0.500mm)" at 117.689,17.281 h1.52
  text "NPTH" at 133.858,17.281 h1.52
  text "Slot" at 140.44,17.281 h1.52
  text "Top Layer - Bottom Layer" at 149.969,17.281 h1.52
  text "+/-1.18mil" at 168.367,17.281 h1.52
  text "2" at 109.252,14.123 h1.52
  text "23.62mil (0.600mm)" at 117.689,14.123 h1.52
  text "PTH" at 133.858,14.123 h1.52
  text "Slot" at 140.44,14.123 h1.52
  text "Top Layer - Bottom Layer" at 149.969,14.123 h1.52
  text "+/-1.97mil" at 168.367,14.123 h1.52
  text "2" at 109.252,10.966 h1.52
  text "27.56mil (0.700mm)" at 117.689,10.966 h1.52
  text "PTH" at 133.858,10.966 h1.52
  text "Slot" at 140.44,10.966 h1.52
  text "Top Layer - Bottom Layer" at 149.969,10.966 h1.52
  text "+/-1.97mil" at 168.367,10.966 h1.52
  text "2" at 109.252,7.808 h1.52
  text "27.56mil (0.700mm)" at 117.689,7.808 h1.52
  text "PTH" at 133.858,7.808 h1.52
  text "Slot" at 140.44,7.808 h1.52
  text "Top Layer - Bottom Layer" at 149.969,7.808 h1.52
  text "+/-1.97mil" at 168.367,7.808 h1.52
  text "2656 Total" at 109.252,4.65 h1.52
  text "Slot definitions :" at 101.617,2.44 h1.52
  text "Routed Path Length" at 113.066,2.44 h1.52
  text "= Calculated from tool start centre position to tool end centre position." at 126.775,2.44 h1.52
  text "Hole Length" at 113.066,1.177 h1.52
  text "= Routed Path Length + Tool Size = Slot length as defined in the PCB layout" at 121.7,1.177 h1.52
  text ".Layer_Name" at 14.656,-21.222 h1.52
M17 Embedded Cavity:
  text ".Layer_Name" at 14.656,-21.222 h1.52
M18 Embedded Assembly:
  text ".Layer_Name" at 14.656,-21.222 h1.52
M19 Embedded Keepout:
  text ".Layer_Name" at 14.656,-21.222 h1.52

## Dimensions
97.993,-0.762 to 2.925,-3.607 on M2 Board Dimensions
0,-9.576 to 25.4,-9.576 on M2 Board Dimensions
0,0.584 to -5.004,43.129 on M2 Board Dimensions

## Text inside footprints (layer, text, board x,y; h text height)
U7: Top Overlay "*" at 60.353,8.62 h1.27 r90; M13 Component Bodies Top "*" at 60.353,11.003 h1.27 r90
U8: Top Overlay "REFDES" at 16.091,-1.397 h1.27; Top Overlay "*" at 15.697,0.543 h1.27; Top Overlay "RefDes" at 16.408,-1.397 h1.27; M13 Component Bodies Top "*" at 16.878,-0.61 h1.27; M13 Component Bodies Top "RefDes2" at 16.091,-1.397 h1.27